# Altium PCB ARGUS.PcbDoc (part 2 of 4)
Units mm, origin at the board's own origin, x right, y up, seen from the top; angles counter-clockwise.
Board outline 134 x 81 mm, 6 copper layers (L1 [SIG], L2 [GND], L3 [PWR], L4 [SIG], L5 [GND], L6 [SIG]), stack 1.538 mm thick; 452 components, 305 nets, 1467 pads, 826 vias.
Unrouted connection lines stored in the file: 646.
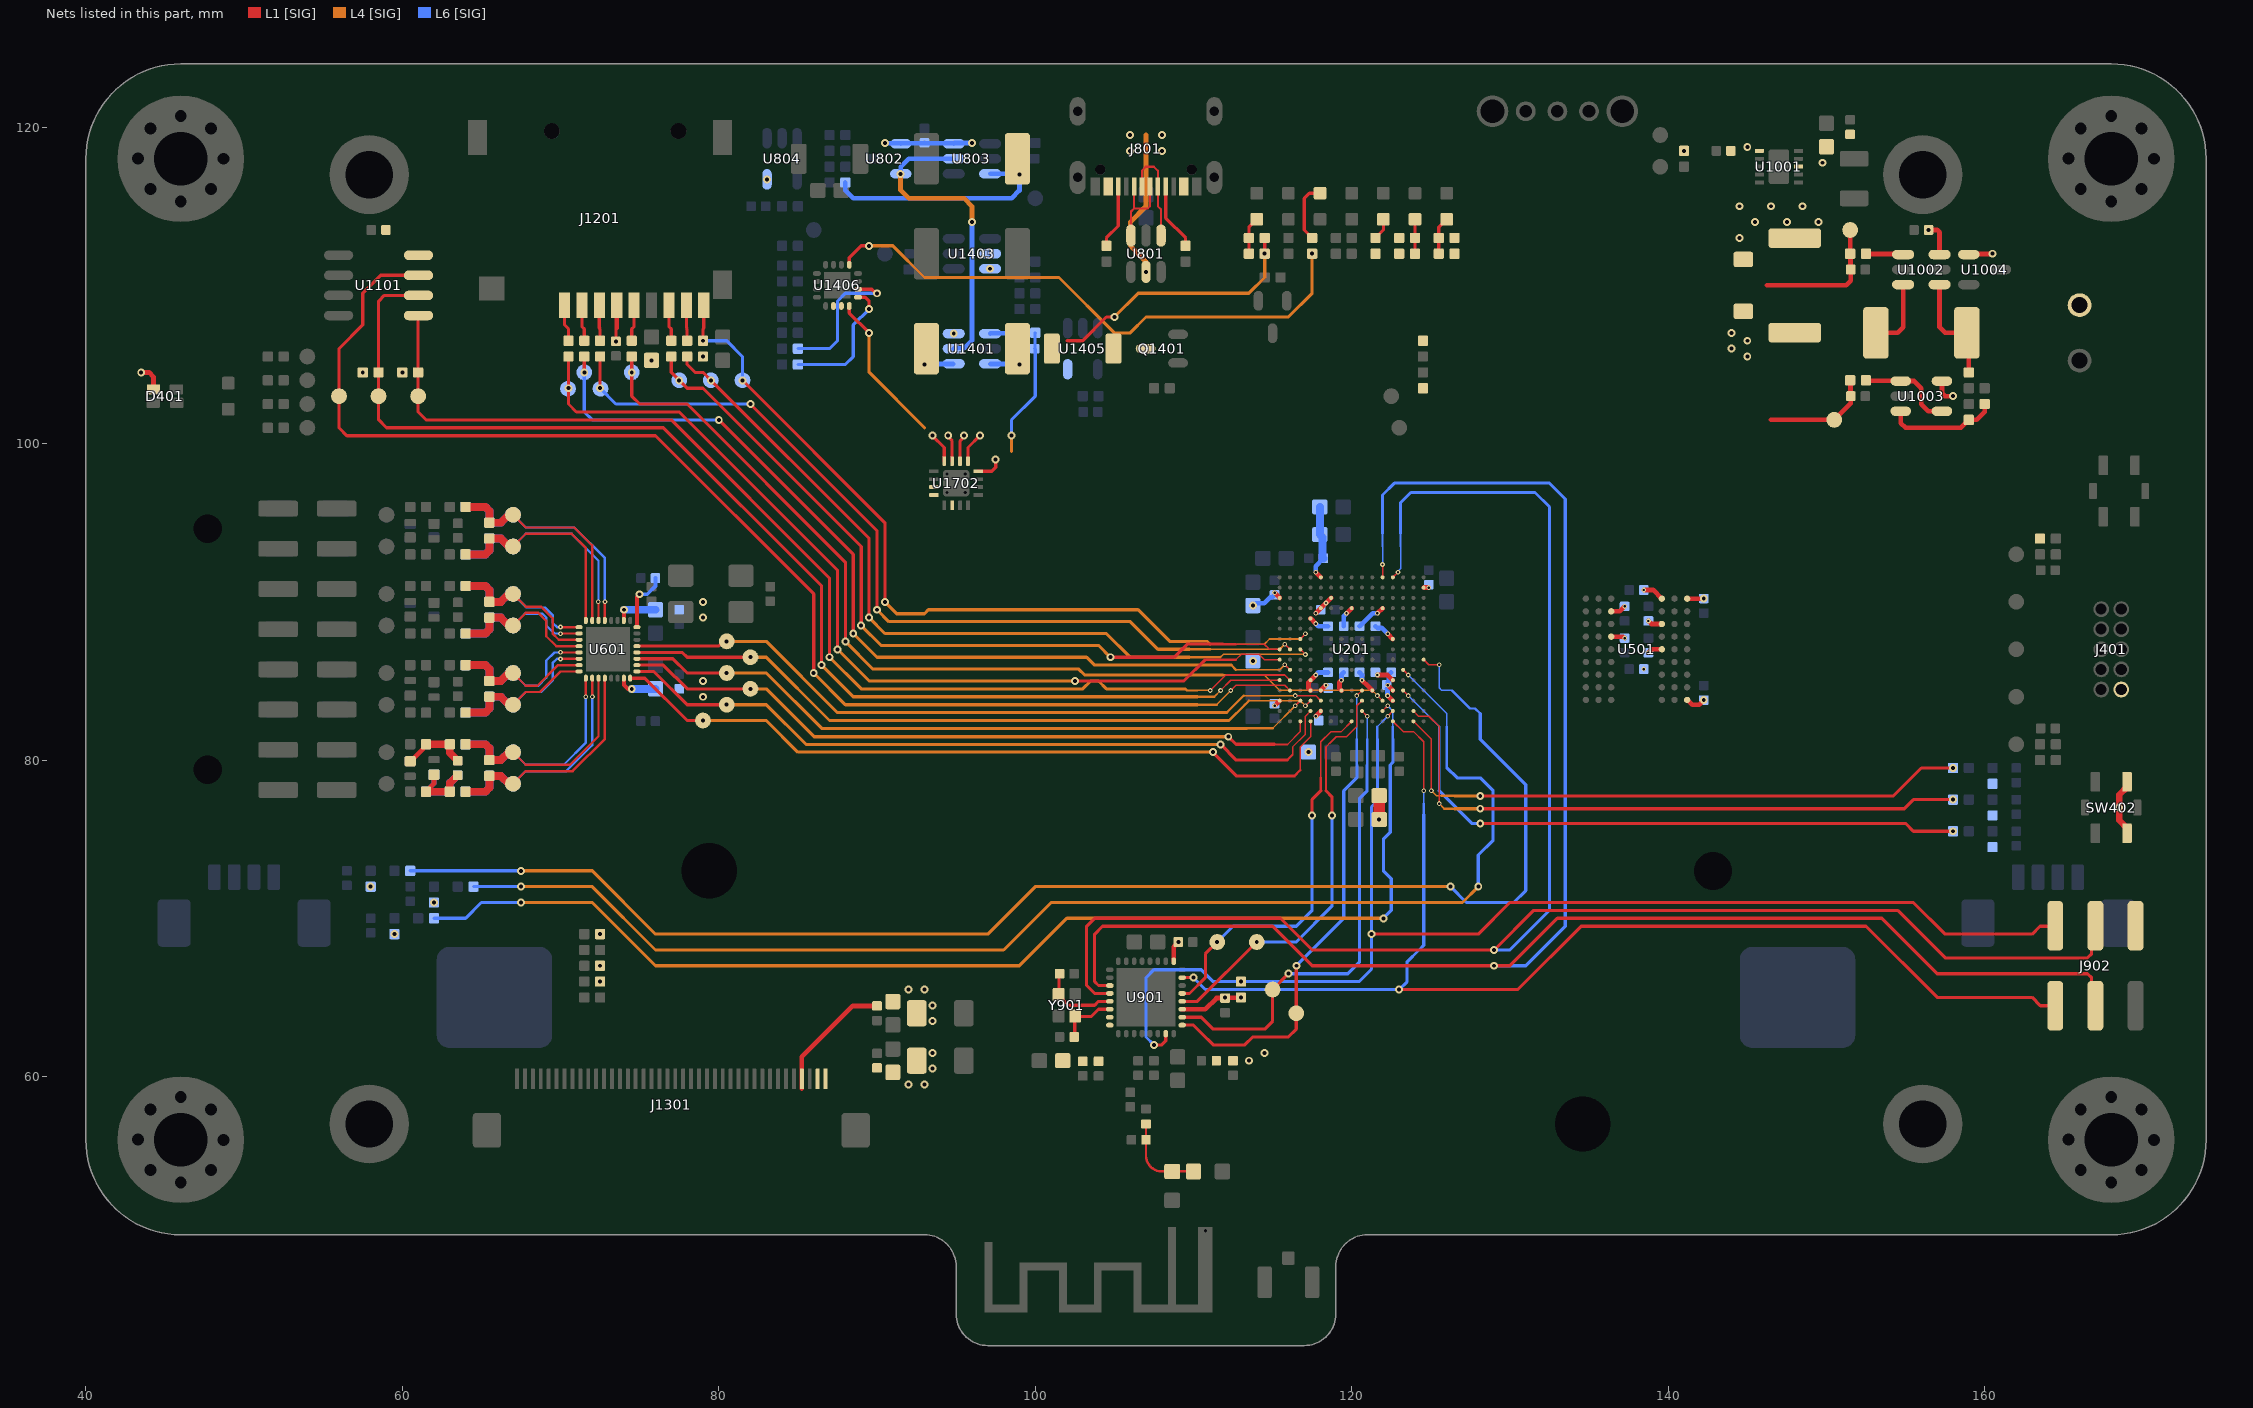
[diagram p6: the nets of this part, all layers, seen from the top]

## Footprints (in the part's own frame and the unit in brackets; to place one, negate y for a bottom-side part, rotate by r counter-clockwise, add the part's x,y. Pads: shape width x height; smd on the part's side, far side on the other; paste and mask are expansions set on the pad) (continued)
REF3016EAIDBZR [mm] "SOT23, 3-Leads, Body 2.92x2.37mm, Pitch 0.95mm, IPC Medium Density"
  oval 1.35x0.6 smd: 1(-1,0.95) 2(-1,-0.95) 3(1,0)
  silkscreen extent -1.61,-1.58 0.76,1.64, body extent -1.32,-1.46 1.32,1.46, height 1.12
RES_0402_A [mm] "Chip Resistor, 2-Leads, Body 1.00x0.50mm, IPC Low Density"
  rrect25% 0.65x0.65 smd: 1(-0.5,0) 2(0.5,0)
  body extent -0.5,-0.25 0.5,0.25, height 0.35
RES_0603_A [mm] "Chip Resistor, 2-Leads, Body 1.60x0.80mm, IPC Low Density"
  rrect25% 0.975x1 smd: 1(-0.913,0) 2(0.912,0)
  silkscreen extent -0.16,-0.51 0.16,0.51, body extent -0.8,-0.4 0.8,0.4, height 0.45
SC32S-7PF20PPM [mm] "32.768 kHz ±20ppm Crystal 7pF 70 kOhms 2-SMD, No Lead"
  rrect25% 1x1.8 smd: 1(-1.25,0) 2(1.25,0)
  silkscreen extent -0.6,-0.9 0.6,0.9, body extent -1.65,-0.8 1.65,0.8, height 0.84
SMLD12E3N1WT86 [mm] "Blue-Green 496nm LED Indication - Discrete 2.9V 0603 (1608 Metric)"
  rrect25% 0.8x0.8 smd: 1(-0.825,0) 2(0.825,0)
  silkscreen extent 0.5,-0.6 1.4,0.6, body extent -0.8,-0.4 0.8,0.4, height 0.55
STDCZS1-25M [mm] "25 MHz ±15ppm Crystal 8pF 80 Ohms 4-SMD, No Lead"
  rrect25% 0.85x0.75 smd: 1(-0.675,-0.525) 2(0.675,-0.525) 3(0.675,0.525) 4(-0.675,0.525)
  silkscreen extent -1.3,-1.1 -0.25,-0.25, body extent -1.05,-0.85 1.05,0.85, height 0.51
STM32H725IGK3 [mil]
  round 10 smd paste+0 mask+0: A1(-179.13,179.13) A2(-153.54,179.13) A3(-127.95,179.13) A4(-102.36,179.13) A5(-76.77,179.13) A6(-51.18,179.13) A7(-25.59,179.13) A8(0,179.13) A9(25.59,179.13) A10(51.18,179.13) A11(76.77,179.13) A12(102.36,179.13) A13(127.95,179.13) A14(153.54,179.13) A15(179.13,179.13) B1(-179.13,153.54) B2(-153.54,153.54) B3(-127.95,153.54) B4(-102.36,153.54) B5(-76.77,153.54) B6(-51.18,153.54) B7(-25.59,153.54) B8(0,153.54) B9(25.59,153.54) B10(51.18,153.54) B11(76.77,153.54) B12(102.36,153.54) B13(127.95,153.54) B14(153.54,153.54) B15(179.13,153.54) C1(-179.13,127.95) C2(-153.54,127.95) C3(-127.95,127.95) C4(-102.36,127.95) C5(-76.77,127.95) C6(-51.18,127.95) C7(-25.59,127.95) C8(0,127.95) C9(25.59,127.95) C10(51.18,127.95) C11(76.77,127.95) C12(102.36,127.95) C13(127.95,127.95) C14(153.54,127.95) C15(179.13,127.95) D1(-179.13,102.36) D2(-153.54,102.36) D3(-127.95,102.36) D4(-102.36,102.36) D5(-76.77,102.36) D6(-51.18,102.36) D7(-25.59,102.36) D8(0,102.36) D9(25.59,102.36) D10(51.18,102.36) D11(76.77,102.36) D12(102.36,102.36) D13(127.95,102.36) D14(153.54,102.36) D15(179.13,102.36) E1(-179.13,76.77) E2(-153.54,76.77) E3(-127.95,76.77) E4(-102.36,76.77) E12(102.36,76.77) E13(127.95,76.77) E14(153.54,76.77) E15(179.13,76.77) F1(-179.13,51.18) F2(-153.54,51.18) F3(-127.95,51.18) F4(-102.36,51.18) F6(-51.18,51.18) F7(-25.59,51.18) F8(0,51.18) F9(25.59,51.18) F10(51.18,51.18) F12(102.36,51.18) F13(127.95,51.18) F14(153.54,51.18) F15(179.13,51.18) G1(-179.13,25.59) G2(-153.54,25.59) G3(-127.95,25.59) G4(-102.36,25.59) G6(-51.18,25.59) G7(-25.59,25.59) G8(0,25.59) G9(25.59,25.59) G10(51.18,25.59) G12(102.36,25.59) G13(127.95,25.59) G14(153.54,25.59) G15(179.13,25.59) H1(-179.13,0) H2(-153.54,0) H3(-127.95,0) H4(-102.36,0) H6(-51.18,0) H7(-25.59,0) H8(0,0) H9(25.59,0) H10(51.18,0) H12(102.36,0) H13(127.95,0) H14(153.54,0) H15(179.13,0) J1(-179.13,-25.59) J2(-153.54,-25.59) J3(-127.95,-25.59) J4(-102.36,-25.59) J6(-51.18,-25.59) J7(-25.59,-25.59) J8(0,-25.59) J9(25.59,-25.59) J10(51.18,-25.59) J12(102.36,-25.59) J13(127.95,-25.59) J14(153.54,-25.59) J15(179.13,-25.59) K1(-179.13,-51.18) K2(-153.54,-51.18) K3(-127.95,-51.18) K4(-102.36,-51.18) K6(-51.18,-51.18) K7(-25.59,-51.18) K8(0,-51.18) K9(25.59,-51.18) K10(51.18,-51.18) K12(102.36,-51.18) K13(127.95,-51.18) K14(153.54,-51.18) K15(179.13,-51.18) L1(-179.13,-76.77) L2(-153.54,-76.77) L3(-127.95,-76.77) L4(-102.36,-76.77) L12(102.36,-76.77) L13(127.95,-76.77) L14(153.54,-76.77) L15(179.13,-76.77) M1(-179.13,-102.36) M2(-153.54,-102.36) M3(-127.95,-102.36) M4(-102.36,-102.36) M5(-76.77,-102.36) M6(-51.18,-102.36) M7(-25.59,-102.36) M8(0,-102.36) M9(25.59,-102.36) M10(51.18,-102.36) M11(76.77,-102.36) M12(102.36,-102.36) M13(127.95,-102.36) M14(153.54,-102.36) M15(179.13,-102.36) N1(-179.13,-127.95) N2(-153.54,-127.95) N3(-127.95,-127.95) N4(-102.36,-127.95) N5(-76.77,-127.95) N6(-51.18,-127.95) N7(-25.59,-127.95) N8(0,-127.95) N9(25.59,-127.95) N10(51.18,-127.95) N11(76.77,-127.95) N12(102.36,-127.95) N13(127.95,-127.95) N14(153.54,-127.95) N15(179.13,-127.95) P1(-179.13,-153.54) P2(-153.54,-153.54) P3(-127.95,-153.54) P4(-102.36,-153.54) P5(-76.77,-153.54) P6(-51.18,-153.54) P7(-25.59,-153.54) P8(0,-153.54) P9(25.59,-153.54) P10(51.18,-153.54) P11(76.77,-153.54) P12(102.36,-153.54) P13(127.95,-153.54) P14(153.54,-153.54) P15(179.13,-153.54) R1(-179.13,-179.13) R2(-153.54,-179.13) R3(-127.95,-179.13) R4(-102.36,-179.13) R5(-76.77,-179.13) R6(-51.18,-179.13) R7(-25.59,-179.13) R8(0,-179.13) R9(25.59,-179.13) R10(51.18,-179.13) R11(76.77,-179.13) R12(102.36,-179.13) R13(127.95,-179.13) R14(153.54,-179.13) R15(179.13,-179.13)
  silkscreen extent -205,-205 205,205, body extent -200,-200 200,200, height 24
TLA2528 [mm]
  rrect25% 0.6x0.24 smd: 1(-1.4,0.75) 2(-1.4,0.25) 3(-1.4,-0.25) 4(-1.4,-0.75) 9(1.4,-0.75) 10(1.4,-0.25) 11(1.4,0.25) 12(1.4,0.75)
  rrect25% 0.24x0.6 smd: 5(-0.75,-1.4) 6(-0.25,-1.4) 7(0.25,-1.4) 8(0.75,-1.4) 13(0.75,1.4) 14(0.25,1.4) 15(-0.25,1.4) 16(-0.75,1.4)
  round 0.3 hole 0.2: 17(-0.58,-0.58) 17(-0.58,0.58) 17(0.58,-0.58) 17(0.58,0.58)
  rrect25% 1.68x1.68 smd: 17(0,0)
  silkscreen extent -1.61,-1.6 1.6,1.6, body extent -1.5,-1.5 1.5,1.5, height 0.8
TPS61232DRCR [mm] "Boost Switching Regulator IC Positive Fixed 5V 1 Output 5A (Switch) 10-VFDFN Exposed Pad"
  rrect25% 0.6x0.24 smd: 1(-1.4,1) 2(-1.4,0.5) 3(-1.4,0) 4(-1.4,-0.5) 5(-1.4,-1) 6(1.4,-1) 7(1.4,-0.5) 8(1.4,0) 9(1.4,0.5) 10(1.4,1)
  rrect25% 0.18x0.625 smd: 11(-0.615,1.188) 11(-0.615,1.388) 11(-0.615,-1.388) 11(-0.615,-1.188) 11(-0.205,1.188) 11(-0.205,1.388) 11(-0.205,-1.388) 11(-0.205,-1.188) 11(0.205,1.188) 11(0.205,1.388) 11(0.205,-1.388) 11(0.205,-1.188) 11(0.615,1.188) 11(0.615,1.388) 11(0.615,-1.388) 11(0.615,-1.188)
  round 0.4 hole 0.2: 11(-0.55,0) 11(0,0.825) 11(0,-0.825) 11(0.55,0)
  rrect25% 1.6x2.15 smd: 11(0,0)
  silkscreen extent -1.61,-1.6 1.6,1.6, body extent -1.5,-1.5 1.5,1.5, height 0.77
TPS79933DDCR [mm] "SOT23, 5-Leads, Body 2.90x2.80mm, Pitch 0.95mm, IPC Medium Density"
  oval 1.35x0.6 smd: 1(-1.2,0.95) 2(-1.2,0) 3(-1.2,-0.95) 4(1.2,-0.95) 5(1.2,0.95)
  silkscreen extent -1.81,-1.59 0.94,1.76, body extent -1.53,-1.45 1.53,1.45, height 1.1
TS21-34-035-BK-160-SMT-TR [mm] "Tactile Switch SPST-NO Top Actuated Surface Mount"
  rrect25% 1.25x0.6 smd: 1(-1.625,1) 1(1.625,1) 2(-1.625,-1) 2(1.625,-1)
  rrect25% 1x0.5 smd: 3(0,1.65) 3(0,-1.65)
  silkscreen extent -1.8,-1.8 1.8,1.8, body extent -2,-1.7 2,1.7, height 1.5
U.FL-R-SMT-1(80) [mm] "U.FL (UMCC) Connector Receptacle, Male Pin 50 Ohms Surface Mount Solder"
  rrect25% 0.8x0.85 smd: 1(0,-1.525)
  rrect25% 0.9x2 smd: 2(-1.5,0) 3(1.5,0)
  silkscreen extent -1.4,-1.4 1.4,1.4, body extent -1.5,-1.55 1.5,1.55, height 1.25
"Unlabelled Testpoint" [mm] "1.5mm Diameter testpoint"
  round 1 smd paste-2539.97: 1(0,0)
  silkscreen extent -0.6,-0.6 0.6,0.6
USB4105-GF-A [mm] "USB-C (USB TYPE-C) USB 2.0 Receptacle Connector 24 (16+8 Dummy) Position Surface Mount, Right Angle; Through Hole"
  rect 0.6x1.15 smd mask+0.05: A1B12(-3.2,4.755) A4B9(-2.4,4.755) A9B4(2.4,4.755) A12B1(3.2,4.755)
  rect 0.3x1.15 smd mask+0.05: A5(-1.25,4.755) A6(-0.25,4.755) A7(0.25,4.755) A8(1.25,4.755) B5(1.75,4.755) B6(0.75,4.755) B7(-0.75,4.755) B8(-1.75,4.755)
  oval 1x2.1 hole 0.6 slot 1.7 at 90 deg paste+0: SH(-4.32,4.18) SH(4.32,4.18)
  oval 1x1.8 hole 0.6 slot 1.4 at 90 deg paste+0: SH(-4.32,0) SH(4.32,0)
  round 0.65 hole 0.65 unplated: ""(-2.89,3.68) ""(2.89,3.68)
  silkscreen extent -4.47,-2.6 4.47,2.65, body extent -4.47,-2.6 4.47,5.11, height 3.31
USBLC6-2SC6 [mm] "SOT23, 6-Leads, Body 2.93x2.80mm, Pitch 0.95mm, IPC Medium Density"
  oval 1.4x0.6 smd: 1(-1.15,0.95) 2(-1.15,0) 3(-1.15,-0.95) 4(1.15,-0.95) 5(1.15,0) 6(1.15,0.95)
  silkscreen extent -1.79,-1.59 0.94,1.76, body extent -1.5,-1.46 1.5,1.46, height 1.45
VMS-R010-1.0-U [mm] "Chip Resistor, 2-Leads, Body 6.35x3.05mm, IPC Medium Density"
  rrect25% 1.6x3.25 smd: 1(-2.875,0) 2(2.875,0)
  silkscreen extent -1.81,-1.69 1.81,1.69, body extent -3.18,-1.53 3.18,1.53, height 0.55
Waveshare_16249 [mm]
  round 5 hole 3: M(-49.09,30) M(-49.09,-30) M(49.09,30) M(49.09,-30)
  body extent -53,-33.95 53,33.95, height 20.45

## Part data
ANT901: library part Meandering_Inverted_F_Antenna, "2.4GHz meandering inverted F antenna. Taken from Texas Instruments AN043."
C301 C303 C314 C316 C318 C319 C321 C325 C326 C327 C601 C603 C801 C901 C907 C910 C1001 C1201 C1203 C1302 C1305 C1405 C1406 C1407 C1408 C1603 C1604 C1607 C1701 C1703 C1705 C1710: library part CAP_0603, "0603 SMD Capacitor"
C302 C304 C305 C306 C307 C308 C309 C310 C311 C312 C313 C315 C317 C320 C322 C323 C324 C401 C402 C403 C404 C501 C502 C503 C504 C505 C506 C507 C508 C602 C604 C605 C606 C607 C608 C701_1 C701_2 C701_3 C701_4 C701_5 C701_6 C701_7 C701_8 C802 C803 C804 C902 C903 C904 C905 C906 C908 C909 C911 C912 C913 C914 C1002 C1003 C1005 C1006 C1007 C1101 C1202 C1301 C1304 C1401 C1402 C1403 C1404 C1502 C1504 C1606 C1608 C1610 C1612 C1702 C1704 C1706 C1707 C1708 C1709 C1801 C1802 C1803 C1804 C1805 C1806: library part CAP_0402, "0402 SMD Capacitor"
C1004: library part CAP_GENERIC_POLARISED, "10 F (EDLC) Supercapacitor 3.8 V Radial, Can 510mOhm @ 1kHz 1000 Hrs @ 85°C", Part Number=LIC0813Q3R8106
C1303 C1306 C1501 C1503 C1601 C1602 C1605 C1609 C1611: library part CAP_1206, "1206 SMD Capacitor"
D401: "Red, Green, Blue (RGB) 624nm Red, 525nm Green, 470nm Blue LED Indication - Discrete 2.1V Red, 3.35V Green, 3.35V Blue 0606 (1616 Metric)", Supplier 1="Arrow Electronics", Supplier Part Number 1=LTST-C19HE1WT
D402 D1401 D1402 D1404 D1405 D1501 D1601 D1602: library part LED_Generic, Part Number=SMLD12E3N1WT86, Supplier Part Number 1=SMLD12E3N1WT86CT-ND, Supplier 1=DigiKey
D701_1 D701_2 D701_3 D701_4 D701_5 D701_6 D701_7 D701_8 D702_1 D702_2 D702_3 D702_4 D702_5 D702_6 D702_7 D702_8: "TVS DIODE 21VWM 35.7VC CST2C", Supplier 1=Avnet, Supplier Part Number 1=DF2S23P2CTC,L3F
D1001: "DIODE SCHOTTKY 100V 500MA SOD123", Supplier Part Number 1=3757-BAS100AS_R1_00001CT-ND, Supplier 1=DigiKey
DISP1301: library part Waveshare_16249, "Connector for Waveshare 16249 Display."
F1401 F1402 F1501 F1601: library part FUSE_GENERIC, "Generic Fuse Symbol", Part Number=0ZCJ0100FF2E, Supplier Part Number 1=48AC8418, Supplier 1=Avnet
F1602: library part FUSE_GENERIC, "Generic Fuse Symbol", Part Number=0ZCH0010FF2E, Supplier Part Number 1=48AC8402, Supplier 1=Avnet
J401: "Connector Header Through Hole 10 position 0.050\" (1.27mm)", Supplier Part Number 1=1175-1627-ND, Supplier 1=DigiKey
J601: "Connector Header Surface Mount, Right Angle 16 position 0.100\" (2.54mm)", Supplier Part Number 1=732-6072-6-ND, Supplier 1=DigiKey
J602: "16 Position Receptacle Connector 0.100\" (2.54mm) Surface Mount, Right Angle Gold", Supplier Part Number 1=952-3179-1-ND, Supplier 1=DigiKey
J801: "USB-C (USB TYPE-C) USB 2.0 Receptacle Connector 24 (16+8 Dummy) Position Surface Mount, Right Angle; Through Hole", Supplier 1="Future Electronics", Supplier Part Number 1=USB4105-GF-A
J901: "U.FL (UMCC) Connector Receptacle, Male Pin 50 Ohms Surface Mount Solder", Supplier 1="Future Electronics", Supplier Part Number 1=U.FL-R-SMT-1(10)
J902: "Connector Header Surface Mount 6 position 0.100\" (2.54mm)", Supplier Part Number 1=952-1922-ND, Supplier 1=DigiKey
J1201: "CONN MICROSD CARD R/A SMD", Supplier 1="Arrow Electronics", Supplier Part Number 1=MSD-1-A
J1301: "40 Position FFC, FPC Connector Contacts, Bottom 0.020\" (0.50mm) Surface Mount, Right Angle", Supplier 1="Future Electronics", Supplier Part Number 1=FH12-40S-0.5SH(55)
J1401: library part 1042P, "BATTERY HOLDER 18650 SMD", Supplier Part Number 1=36-1042P-ND, Supplier 1=DigiKey
J1801 J1802: "Connector Header Surface Mount, Right Angle 4 position 0.049\" (1.25mm)", Supplier 1="Arrow Electronics", Supplier Part Number 1=0532614004
L901 L902: library part IND_GENERIC, "LQG15HN2N0C02D", Part Number=LQG15HN2N0C02D
L1501: library part IND_GENERIC, "1 µH Shielded Molded Inductor 7.5 A 18.1mOhm Max Nonstandard", Supplier Part Number 1=IHLP2020BZER1R0M11, Supplier 1="Arrow Electronics"
L1601: library part IND_GENERIC, "Generic inductor symbol", Part Number=74438324015
MH101 MH102 MH103 MH104: library part M3_Mounting_Hole
Q1401 Q1402: "MOSFET P-CH 20V 4.3A SOT23", Supplier Part Number 1=DMP2045U-7DICT-ND, Supplier 1=DigiKey
R401 R402 R403 R404 R405 R406 R407 R408 R701_1 R701_2 R701_3 R701_4 R701_5 R701_6 R701_7 R701_8 R702_1 R702_2 R702_3 R702_4 R702_5 R702_6 R702_7 R702_8 R703_1 R703_2 R703_3 R703_4 R703_5 R703_6 R703_7 R703_8 R704_1 R704_2 R704_3 R704_4 R704_5 R704_6 R704_7 R704_8 R705_1 R705_2 R705_3 R705_4 R705_5 R705_6 R705_7 R705_8 R801 R802 R804 R805 R806 R807 R808 R809 R901 R1001 R1002 R1003 R1006 R1007 R1008 R1009 R1010 R1101 R1102 R1201 R1202 R1203 R1204 R1205 R1206 R1207 R1301 R1302 R1303 R1304 R1305 R1401 R1402 R1403 R1404 R1405 R1406 R1407 R1408 R1409 R1410 R1411 R1412 R1413 R1415 R1416 R1417 R1419 R1420 R1421 R1422 R1424 R1425 R1426 R1427 R1428 R1429 R1430 R1431 R1501 R1502 R1503 R1504 R1505 R1506 R1601 R1602 R1603 R1604 R1605 R1606 R1607 R1608 R1609 R1610 R1611 R1612 R1701 R1702 R1801 R1802 R1803 R1804 R1805 R1806 R1807 R1808 R1809 R1810 R1811 R1812: library part RES_0402, "0402 SMD Resistor"
R803 R1005 R1414 R1418: library part RES_GENERIC, "VMS-R010-1.0-U", Power=4W, Supplier Part Number 1=4423-VMS-R010-1.0-UDKR-ND, Supplier 1=DigiKey
R902 R903: library part RES_0603, "0603 SMD Resistor"
R1004: library part RES_GENERIC, "Generic resistor symbol", Part Number=CRM2512-FX-10R0ELF
SW401 SW402: "Tactile Switch SPST-NO Top Actuated Surface Mount", Supplier Part Number 1=2223-TS21-34-035-BK-160-SMT-TRDKR-ND, Supplier 1=DigiKey
SW1401: "SWITCH SLIDE SPDT 100MA 12V"
TP301 TP302 TP401 TP402 TP403 TP405 TP406 TP407 TP408 TP601 TP602 TP603 TP604 TP605 TP607 TP608 TP609 TP610 TP611 TP612 TP613 TP614 TP615 TP616 TP617 TP618 TP619 TP620 TP621 TP622 TP623 TP624 TP625 TP626 TP627 TP628 TP629 TP630 TP631 TP632 TP633 TP634 TP635 TP636 TP637 TP638 TP639 TP802 TP803 TP901 TP902 TP903 TP904 TP1001 TP1002 TP1003 TP1004 TP1005 TP1006 TP1101 TP1102 TP1103 TP1201 TP1202 TP1203 TP1204 TP1205 TP1206 TP1207 TP1401 TP1402 TP1403 TP1404 TP1405 TP1408 TP1409 TP1410 TP1501 TP1502 TP1504 TP1601 TP1603 TP1605: library part "Unlabelled Testpoint", "Symbol for an unlabelled testpoint"
TP801 TP1406 TP1407 TP1503 TP1602 TP1604: library part "Labelled Testpoint", "Symbol for a labelled testpoint"
U201: "High-performance and DSP with DP-FPU, Arm Cortex-M7 MCU with 1 MByte Flash, 564 KBytes RAM, 550 MHz CPU, L1 cache, external memory interface, SMPS, subset of peripherals", Manufacturer_Name=STMicroelectronics, Manufacturer_Part_Number=STM32H725IGK3, RefDes=RefDes, Supplier 1="Future Electronics", Supplier Part Number 1=STM32H725IGK3, Type=Type
U501: "SDRAM Memory IC 128Mbit Parallel 166 MHz 5 ns 54-TFBGA (8x8)", Supplier Part Number 1=1450-AS4C8M16SA-6BINCT-ND, Supplier 1=DigiKey
U601: "24 Bit Analog to Digital Converter 8 Input 8 Sigma-Delta 32-QFN (4x4)", Supplier Part Number 1=296-ADS131M08IRSNTCT-ND, Supplier 1=DigiKey
U801: "17V Clamp 5A (8/20µs) Ipp Tvs Diode Surface Mount SOT-23-6", Supplier 1="Arrow Electronics", Supplier Part Number 1=USBLC6-2SC6
U802 U1004: "Series Voltage Reference IC Fixed 1.65V V ±0.1% 25 mA SOT-23-3", Supplier Part Number 1=296-REF3016EAIDBZRCT-ND, Supplier 1=DigiKey
U803 U1002 U1401 U1403: "Current Sense Amplifier 1 Circuit Rail-to-Rail SOT-23-6", Supplier Part Number 1=296-INA181A2QDBVRQ1CT-ND, Supplier 1=DigiKey
U804 U1003 U1404 U1405 U1502 U1602 U1604: "Standard (General Purpose) Amplifier 1 Circuit Rail-to-Rail SOT-23-5", Supplier 1="Arrow Electronics", Supplier Part Number 1=MCP6071T-E/OT
U901: "ESP32-C3FH4X IS AN LOW-POWER AND", Supplier Part Number 1=1965-ESP32-C3FH4XCT-ND, Supplier 1=DigiKey
U1001: "IC RTC CLK/CALENDAR I2C 10DFN", Supplier Part Number 1=PCF85363ATL/AX, Supplier 1="Arrow Electronics"
U1101: "IC EEPROM 2KBIT I2C 400KHZ 8SOIC", Supplier 1="Arrow Electronics", Supplier Part Number 1=M24C02-WMN6TP
U1406: "Charger IC Lithium Ion 16-VQFN (3x3)", Supplier Part Number 1=296-38873-1-ND, Supplier 1=DigiKey
U1501: "Boost Switching Regulator IC Positive Fixed 5V 1 Output 5A (Switch) 10-VFDFN Exposed Pad", Supplier Part Number 1=296-44498-6-ND, Supplier 1=DigiKey
U1601: "Buck Switching Regulator IC Positive Adjustable 1V 1 Output 1.5A 12-WFDFN Exposed Pad", Supplier Part Number 1=296-LM63615DQDRRRQ1DKR-ND, Supplier 1=DigiKey
U1603: "Linear Voltage Regulator IC Positive Fixed 1 Output 200mA SOT-23-THIN", Supplier Part Number 1=296-17783-6-ND, Supplier 1=DigiKey
U1701 U1702: "12 Bit Analog to Digital Converter 8 Input 1 SAR 16-WQFN (3x3)", Supplier Part Number 1=595-TLA2528IRTER, Supplier 1=Mouser
Y401: "25 MHz ±15ppm Crystal 8pF 80 Ohms 4-SMD, No Lead", Supplier Part Number 1=644-STDCZS1-25MDKR-ND, Supplier 1=DigiKey
Y601: "8.192 MHz ±30ppm Crystal 10pF 150 Ohms 4-SMD, No Lead", Supplier Part Number 1=1923-LFXTAL061486CT-ND, Supplier 1=DigiKey
Y901: "40 MHz ±10ppm Crystal 10pF 40 Ohms 4-SMD, No Lead", Supplier 1="Future Electronics", Supplier Part Number 1=ECS-400-10-37B2-CKY-TR
Y1001: "32.768 kHz ±20ppm Crystal 7pF 70 kOhms 2-SMD, No Lead", Supplier 1="Arrow Electronics", Supplier Part Number 1=SC32S-7PF20PPM

## Via types
v1: diameter 0.5, hole 0.25, L1 [SIG] to L6 [SIG], tented both sides, 608 vias
v2: diameter 0.3, hole 0.15, L1 [SIG] to L6 [SIG], tented both sides, 209 vias
v3: diameter 0.5, hole 0.2, L1 [SIG] to L6 [SIG], tented both sides, 9 vias

## Nets (pads, with @x,y where several pads share a name; then routed paths per layer and width w, separated by ;. In a path a pad name is that pad's centre, name@x,y a point inside that pad or via, vN(x,y) a via of type N, cw(c..) or ccw(c..) an arc to the next point about the centre after c; other vN are vias at no path point)
5V_SW: L1501.1 TP1501.1 U1501.1 U1501.2
+1V65_REF: TP1401.1 U802.2 U803.5 U1401.5 U1403.5 | length 19.9
  L4 [SIG] w0.3: v1(91.487,117.038) 91.487,116.013 92,115.5 95.5,115.5 96,115 v1(96,114)
  L6 [SIG] w0.3: U802.2@91.5,117.05 91.5,117.5 92,118 U803.5@94.85,118 ; U1401.5@94.85,106 94.907,106.057 95.557,106.057 96,106.5 96,112.5 v1(96,114) ; U1403.5@97.093,112.057 U1403.5@97.15,112
+3V3: C301.1 C302.1 C303.1 C304.1 C305.1 C306.1 C307.1 C308.1 C309.1 C310.1 C311.1 C312.1 C313.1 C318.1 C319.1 C320.1 C321.1 C322.1 C323.1 C324.1 C501.1 C502.1 C503.1 C504.1 C505.1 C506.1 C507.1 C508.1 C601.1 C602.1 C901.1 C902.1 C903.1 C904.1 C905.1 C906.1 C1101.1 C1201.1 C1202.1 C1304.1 C1305.1 C1306.1 C1703.1 C1704.1 C1708.1 C1709.1 D401.4 D1001.1 F1601.2 J401.1 J902.1 J1201.4 J1301.4 L902.2 R401.2 R901.1 R1001.1 R1002.1 R1003.1 R1101.1 R1102.1 R1207.1 R1301.1 R1304.1 R1305.1 R1801.1 R1803.1 R1805.1 R1807.1 R1809.1 R1811.1 SW402.2 TP1602.1 U201.A3 U201.A13 U201.D4 U201.D5 U201.D11 U201.E2 U201.E4 U201.E12 U201.E15 U201.F13 U201.G4 U201.H12 U201.K4 U201.L12 U201.M5 U201.M9 U201.R14 U501.A7 U501.A9 U501.B3 U501.C7 U501.D3 U501.E7 U501.J9 U601.26 U901.11 U901.17 U901.31 U901.32 U1101.8 U1701.10 U1702.10 | length 53.4
  L1 [SIG] w0.2: v1(73.5,106.46) 73.5,107.25 73.55,107.3
  L1 [SIG] w0.25: U601.26@74,88.825 v1(74,89.5)
  L1 [SIG] w0.3: v1(43.5,104.5) 44,104.5 44.275,104.225 D401.4@44.275,103.425 ; J1201.4@73.5,108.7 J1201.4@73.55,108.75 73.55,107.3 ; J1301.4@85.25,59.25 J1301.4@85.25,59.85 85.25,61.25 88.46,64.46 C1304.1@90,64.46 ; U901.17@108.75,67.287 108.75,68.2 109.04,68.49 v1(109.04,68.5) ; U901.11@109.287,64.25 110.75,64.25 111.46,64.96 C905.1@112,64.96 ; v1(112,65) 112.02,64.98 112.98,64.98 v1(113,65) ; v2(115.125,83.425) U201.A3@115.45,83.75 ; v2(115.125,90.575) U201.A13@115.45,90.25 ; U201.D4@117.4,84.4 117.4,84.414 117.275,84.539 117.275,84.925 U201.D5@117.4,85.05 v2(117.725,85.375) ; U201.D11@117.4,88.95 v2(117.725,88.625) ; v2(117.725,82.775) U201.E2@118.05,83.1 ; v2(117.725,89.275) U201.E12@118.05,89.6 v2(118.375,89.925) U201.F13@118.7,90.25 ; v2(117.725,91.875) U201.E15@118.05,91.55 ; U201.E4@118.05,84.4 v2(118.375,84.725) ; U201.G4@119.35,84.4 119.225,84.525 119.225,84.925 v2(119.35,85.05) ; v2(119.675,89.275) U201.H12@120,89.6 ; v2(120.65,85.05) 121.031,84.669 U201.K4@121.3,84.4 ; v2(121.625,85.375) 122.275,85.375 U201.M5@122.6,85.05 ; v2(121.625,89.275) U201.L12@121.95,89.6 ; v2(122.275,87.975) U201.M9@122.6,87.65 ; U201.R14@124.55,90.9 v2(124.875,90.9) ; U501.D3@136.4,87.8 137.16,87.8 v2(137.25,87.71) ; U501.B3@136.4,89.4 136.94,89.4 v2(137.25,89.71) ; v2(138.46,90.75) 139.05,90.75 U501.A7@139.6,90.2 ; v2(138.75,86.79) 138.96,87 U501.E7@139.6,87 ; v2(138.75,88.79) 138.94,88.6 U501.C7@139.6,88.6 ; U501.J9@141.2,83.8 141.221,83.8 141.521,83.5 141.96,83.5 v1(142.25,83.79) ; U501.A9@141.2,90.2 142.24,90.2 v1(142.25,90.21)
  L1 [SIG] w0.4: SW402.2@169,75.375 169,75.7 168.5,76.2 168.5,77.8 169,78.3 SW402.2@169,78.625
  L6 [SIG] w0.3: v1(113.75,89.763) 113.901,89.914 114.464,89.914 114.84,90.29 114.965,90.29 115.125,90.45 v2(115.125,90.575) ; v2(117.725,85.375) 117.89,85.54 C304.1@118.5,85.54 ; v2(117.725,88.625) 117.89,88.46 C305.1@118.5,88.46 ; v2(117.725,91.875) 117.725,92.255 118.21,92.74 C320.1@118.21,92.75 ; v2(119.35,85.05) 119.35,85.39 C308.1@119.5,85.54 ; C309.1@119.5,88.46 119.5,89.1 v2(119.675,89.275) ; C310.1@120.5,85.54 120.65,85.39 v2(120.65,85.05) ; C311.1@120.5,88.46 120.51,88.46 121.325,89.275 v2(121.625,89.275) ; C313.1@121.5,88.46 121.613,88.347 121.902,88.347 v2(122.275,87.975)
  L6 [SIG] w0.5: v1(74,89.5) C601.1@76,89.5 ; C318.1@117.987,96 C319.1@117.987,94.25 118.16,94.078 118.16,92.8 C320.1@118.21,92.75
  other v1: 113.5,61 114.5,61.5 93.5,63.5 93.5,64.5 92,65.5 93,65.5 72.5,66 72.5,67 59.5,69 72.5,69 62,71 58,72 168.5,77 117.263,80.5 113.75,86.263 79,89 79,90 57.5,104.5 60,104.5 75.75,105.262 79,105.5 145,105.5 144,106 145,106.5 144,107 141,118.5
  other v2: 138.46,85.75
+3V3_BOOT: C1604.1 U1601.2
+3V3_FUSE: C1605.1 C1606.1 F1601.1 L1601.1 R1603.1 R1604.1 R1605.1 U1601.8
+3V3_LED_A: D1601.1 R1603.2 R1604.2 | length 2.2
  L1 [SIG] w0.2: R1603.2@124,112 R1604.2@124,113 D1601.1@124,114.175
+3V3_R\E\S\E\T\: R1602.1 U1601.7
+3V3_RTC: C1001.1 C1002.1 C1003.1 D1001.2 R1004.1 U1001.3 U1001.10
  other v1: 144.5,113 145.5,114 147.5,114 149.5,114 144.5,115 146.5,115 148.5,115 149.75,117.75 145,118.75
+3V3_SW: C1604.2 L1601.2 U1601.1
+3V3_V_DIV: R1606.2 R1607.1 U1602.3
+3V3_V_SENS: C1608.1 TP1603.1 U1602.1 U1602.4 U1702.1 | length 1.9
  L1 [SIG] w0.2: U1702.1@95.75,98.9 95.75,99.75 v1(96.5,100.5)
+3V3_VCC: C1607.1 R1602.2 TP1601.1 U1601.3
+3V3A: C314.1 C315.1 C316.1 C317.1 C603.1 C604.1 C802.1 C1005.1 C1701.1 C1702.1 C1706.1 C1707.1 F1602.2 R1608.1 R1609.1 R1610.1 TP1604.1 U201.M3 U201.M4 U601.15 U802.1 U803.6 U804.5 U1002.6 U1003.5 U1004.1 U1401.6 U1403.6 U1404.5 U1405.5 U1502.5 U1602.5 U1604.5 U1701.7 U1702.7 | length 17.1
  L1 [SIG] w0.25: U601.15@74,85.175 74,84.75 74.25,84.5 v1(74.5,84.5)
  L1 [SIG] w0.3: v2(122.267,84.075) U201.M3@122.592,83.75 ; v2(122.275,84.725) U201.M4@122.6,84.4 ; U201.M3@122.584,83.75 U201.M3@122.6,83.75 ; v1(156.46,113.5) 157,113.5 157.15,113.35 U1002.6@157.15,111.95 ; U1003.5@157.3,103.95 157.3,103.2 157.5,103 v1(158,103) ; U1004.1@159,111.95 159.025,111.975 160.475,111.975 v1(160.5,112)
  L1 [SIG] w0.75: v1(121.737,76.25) C314.1@121.737,77.75
  L6 [SIG] w0.3: v1(90.5,119) 90.525,118.975 91.475,118.975 U802.1@91.5,118.95 91.525,118.975 92.975,118.975 C802.1@93,119 93.025,118.975 94.825,118.975 U803.6@94.85,118.95 94.9,119 v1(96,119) ; C315.1@122.21,84.5 122.267,84.443 v2(122.267,84.075) ; v2(122.275,84.725) 122.275,84.936 122.34,85.001 122.34,85.39 122.49,85.54 C317.1@122.5,85.54
  L6 [SIG] w0.5: v1(74.5,84.5) C603.1@76,84.5
  other v1: 79,84 79,85 94.85,106.95 97.15,111.05 83.05,116.7
+3V3A_FUSE: C1611.1 F1602.1 U1603.5
+3V3A_LED_A: D1602.1 R1608.2 R1609.2 | length 2.4
  L1 [SIG] w0.2: R1609.2@125.5,112 R1608.2@125.5,113 125.5,113.675 D1602.1@126,114.175
+3V3A_NR: C1610.1 U1603.4
+3V3A_V_DIV: R1611.2 R1612.1 U1604.3
+3V3A_V_SENS: C1612.1 TP1605.1 U1604.1 U1604.4 U1702.2 | length 1.7
  L1 [SIG] w0.2: U1702.2@95.25,98.9 95.25,100.169 95.5,100.419 v1(95.5,100.5)
+5V: C1301.1 C1302.1 C1303.1 F1501.2 J1301.1 J1301.2 R1501.2 R1506.1 TP1503.1
  other v1: 92,59.5 93,59.5 93.5,60.5 93.5,61.5
+5V_DIV: R1502.1 R1503.1 U1502.3
+5V_LED_A: D1501.1 R1506.2 | length 1.4
  L1 [SIG] w0.2: R1506.2@121.5,113 122,113.5 D1501.1@122,114.175
+5V_OUT: C1503.1 F1501.1 U1501.3 U1501.4 U1501.7
+5V_SENS: C1504.1 R1505.2 TP1504.1 U1702.16 | length 1.7
  L1 [SIG] w0.2: U1702.16@96.4,98.25 97.25,98.25 97.5,98.5 v1(97.5,99)
+5V_SENS_OUT: R1505.1 U1502.1 U1502.4
\P\G\O\O\D\_LED_K: D1404.2 R1424.1 | length 3.8
  L1 [SIG] w0.2: R1424.1@117.5,113 117,113.5 117,115.5 117.325,115.825 D1404.2@118,115.825
ADC_C\S\: TP634.1 U201.D2 U601.17 | length 47.1
  L1 [SIG] w0.1: 116.262,80.338 116.262,80.825 117.075,81.638 117.075,82.775 U201.D2@117.4,83.1
  L1 [SIG] w0.15: 115.925,80 116.262,80.338
  L1 [SIG] w0.2: U601.17@74.825,85.6 75.9,85.6 78,83.5 v1(80.5,83.5) ; v1(111.712,80.988) 112.7,80 115.925,80
  L4 [SIG] w0.2: v1(80.5,83.5) 83,83.5 85.512,80.988 v1(111.712,80.988)
ADC_D\R\D\Y\: TP638.1 U201.C1 U601.18 | length 45
  L1 [SIG] w0.1: 115.937,80.988 116.75,81.8 U201.C1@116.75,82.45
  L1 [SIG] w0.15: 115.125,80.988 115.937,80.988
  L1 [SIG] w0.2: U601.18@74.825,86 76.5,86 78,84.5 v1(82,84.5) ; v1(112.2,81.475) 112.687,80.988 112.7,81 115.113,81
  L4 [SIG] w0.2: v1(82,84.5) 83,84.5 86.025,81.475 v1(112.2,81.475)
ADC_DIN: TP635.1 U201.E3 U601.21 | length 45.8
  L1 [SIG] w0.1: v2(116.425,84.075) 117.725,84.075 U201.E3@118.05,83.75
  L1 [SIG] w0.2: U601.21@74.825,87.2 79.984,87.2 80.284,87.5 v1(80.5,87.5)
  L4 [SIG] w0.1: 113.175,84.075 113.5,84.075 v2(116.425,84.075)
  L4 [SIG] w0.15: 112.1,83 113.175,84.075
  L4 [SIG] w0.2: v1(80.5,87.5) 83,87.5 87.5,83 112.1,83
ADC_DOUT: TP636.1 U201.D3 U601.20 | length 45.1
  L1 [SIG] w0.1: v2(117.075,83.425) U201.D3@117.4,83.75
  L1 [SIG] w0.2: U601.20@74.825,86.8 77.7,86.8 78,86.5 v1(82,86.5)
  L4 [SIG] w0.1: 113.5,83.75 116.75,83.75 v2(117.075,83.425)
  L4 [SIG] w0.15: 112.25,82.5 113.25,83.5 113.5,83.75
  L4 [SIG] w0.2: v1(82,86.5) 83,86.5 87,82.5 112.25,82.5
ADC_S\Y\N\C\: TP639.1 U201.D1 U601.16 | length 48.4
  L1 [SIG] w0.1: 116.75,79.362 116.75,80.825 117.4,81.475 U201.D1@117.4,82.45
  L1 [SIG] w0.15: 116.387,79 116.75,79.362
  L1 [SIG] w0.2: U601.16@74.4,85.175 75.325,85.175 78,82.5 v1(79,82.5) ; v1(111.225,80.5) 112.737,78.988 116.375,78.988 116.387,79
  L4 [SIG] w0.2: v1(79,82.5) 83,82.5 85,80.5 v1(111.225,80.5)
ADC_SCLK: TP637.1 U201.C3 U601.19 | length 44.5
  L1 [SIG] w0.1: v2(116.425,83.425) U201.C3@116.75,83.75
  L1 [SIG] w0.2: U601.19@74.825,86.4 77.1,86.4 78,85.5 v1(80.5,85.5)
  L4 [SIG] w0.1: 115,82 v2(116.425,83.425)
  L4 [SIG] w0.15: 113.375,82 115,82
  L4 [SIG] w0.2: v1(80.5,85.5) 83,85.5 86.5,82 113.375,82
AIN0_N: R703_8.2 R705_8.2 TP604.1 U601.30 | length 14.3
  L1 [SIG] w0.15: v2(72.386,90) 72.4,89.986 U601.30@72.4,88.825
  L6 [SIG] w0.15: TP604.1@67,93.5 67.8,94.3 70.7,94.3 72.4,92.6 72.4,90.013 v2(72.386,90)
  L6 [SIG] w0.5: R705_8.2@64,93 65.25,93 65.5,93.25 R703_8.2@65.5,94 66.229,94 66.729,93.5 TP604.1@67,93.5
AIN0_P: R702_8.2 R703_8.1 TP602.1 U601.29 | length 14.9
  L1 [SIG] w0.15: U601.29@72.8,88.825 72.8,89.986 v2(72.813,90)
  L6 [SIG] w0.15: TP602.1@67,95.5 67.8,94.7 70.866,94.7 72.8,92.766 72.8,90.013 v2(72.813,90)
  L6 [SIG] w0.5: R702_8.2@64,96 65.25,96 65.5,95.75 R703_8.1@65.5,95 66.229,95 66.729,95.5 TP602.1@67,95.5
AIN1_N: R703_7.2 R705_7.2 TP609.1 U601.31 | length 14.6
  L1 [SIG] w0.15: TP609.1@67,95.5 67.8,94.7 70.866,94.7 72,93.566 U601.31@72,88.825
  L1 [SIG] w0.5: R705_7.2@64,96 65.25,96 65.5,95.75 R703_7.2@65.5,95 66.229,95 66.729,95.5 TP609.1@67,95.5
AIN1_P: R702_7.2 R703_7.1 TP607.1 U601.32 | length 13.9
  L1 [SIG] w0.15: TP607.1@67,93.5 67.8,94.3 70.7,94.3 71.6,93.4 U601.32@71.6,88.825
  L1 [SIG] w0.5: R702_7.2@64,93 65.25,93 65.5,93.25 R703_7.1@65.5,94 66.229,94 66.729,93.5 TP607.1@67,93.5
AIN2_N: R703_6.2 R705_6.2 TP613.1 U601.2 | length 9.4
  L1 [SIG] w0.15: v2(70,87.987) 70.014,88 U601.2@71.175,88
  L6 [SIG] w0.15: TP613.1@67,88.5 67.741,89.241 68.859,89.241 69.1,89 69.1,88.509 69.609,88 69.987,88 v2(70,87.987)
  L6 [SIG] w0.5: R705_6.2@64,88 65.25,88 65.5,88.25 R703_6.2@65.5,89 66.229,89 66.729,88.5 TP613.1@67,88.5
AIN2_P: R702_6.2 R703_6.1 TP611.1 U601.1 | length 9.4
  L1 [SIG] w0.15: v2(70,88.414) 70.014,88.4 U601.1@71.175,88.4
  L6 [SIG] w0.15: TP611.1@67,90.5 67.859,89.641 69.024,89.641 69.5,89.166 69.5,88.675 69.775,88.4 69.987,88.4 v2(70,88.414)
  L6 [SIG] w0.5: R702_6.2@64,91 65.25,91 65.5,90.75 R703_6.1@65.5,90 66.229,90 66.729,90.5 TP611.1@67,90.5
AIN3_N: R703_5.2 R705_5.2 TP617.1 U601.3 | length 10
  L1 [SIG] w0.15: TP617.1@67,90.5 67.8,89.7 68.763,89.7 69.5,88.963 69.5,87.992 69.892,87.6 U601.3@71.175,87.6
  L1 [SIG] w0.5: R705_5.2@64,91 65.25,91 65.5,90.75 R703_5.2@65.5,90 66.229,90 66.729,90.5 TP617.1@67,90.5
AIN3_P: R702_5.2 R703_5.1 TP615.1 U601.4 | length 10
  L1 [SIG] w0.15: TP615.1@67,88.5 67.8,89.3 68.598,89.3 69.1,88.798 69.1,87.826 69.726,87.2 U601.4@71.175,87.2
  L1 [SIG] w0.5: R702_5.2@64,88 65.25,88 65.5,88.25 R703_5.1@65.5,89 66.229,89 66.729,88.5 TP615.1@67,88.5
AIN4_N: R703_4.2 R705_4.2 TP621.1 U601.6 | length 10.1
  L1 [SIG] w0.15: v2(70,86.386) 70.014,86.4 U601.6@71.175,86.4
  L6 [SIG] w0.15: TP621.1@67,83.5 67.8,84.3 68.763,84.3 69.5,85.037 69.5,86.125 69.775,86.4 69.987,86.4 v2(70,86.386)
  L6 [SIG] w0.5: R705_4.2@64,83 65.25,83 65.5,83.25 R703_4.2@65.5,84 66.229,84 66.729,83.5 TP621.1@67,83.5
AIN4_P: R702_4.2 R703_4.1 TP619.1 U601.5 | length 10.1
  L1 [SIG] w0.15: v2(70,86.813) 70.014,86.8 U601.5@71.175,86.8
  L6 [SIG] w0.15: TP619.1@67,85.5 67.8,84.7 68.598,84.7 69.1,85.202 69.1,86.291 69.609,86.8 69.987,86.8 v2(70,86.813)
  L6 [SIG] w0.5: R702_4.2@64,86 65.25,86 65.5,85.75 R703_4.1@65.5,85 66.229,85 66.729,85.5 TP619.1@67,85.5
AIN5_N: R703_3.2 R705_3.2 TP625.1 U601.7 | length 9.1
  L1 [SIG] w0.15: TP625.1@67,85.5 67.8,84.7 68.534,84.7 69.834,86 U601.7@71.175,86
  L1 [SIG] w0.5: R705_3.2@64,86 65.25,86 65.5,85.75 R703_3.2@65.5,85 66.229,85 66.729,85.5 TP625.1@67,85.5
AIN5_P: R702_3.2 R703_3.1 TP623.1 U601.8 | length 9.1
  L1 [SIG] w0.15: TP623.1@67,83.5 67.8,84.3 68.7,84.3 70,85.6 U601.8@71.175,85.6
  L1 [SIG] w0.5: R702_3.2@64,83 65.25,83 65.5,83.25 R703_3.1@65.5,84 66.229,84 66.729,83.5 TP623.1@67,83.5
AIN6_N: R703_2.2 R705_2.2 TP629.1 U601.10 | length 14.3
  L1 [SIG] w0.15: v2@72,84.014 U601.10@72,85.175
  L6 [SIG] w0.15: TP629.1@67,78.5 67.8,79.3 70.366,79.3 72,80.934 72,83.987 v2(72.014,84)
  L6 [SIG] w0.5: R705_2.2@64,78 65.25,78 65.5,78.25 R703_2.2@65.5,79 66.229,79 66.729,78.5 TP629.1@67,78.5
AIN6_P: R702_2.2 R703_2.1 TP627.1 U601.9 | length 13.6
  L1 [SIG] w0.15: v2@71.6,84.014 U601.9@71.6,85.175
  L6 [SIG] w0.15: TP627.1@67,80.5 67.8,79.7 70.2,79.7 71.6,81.1 71.6,83.987 v2(71.587,84)
  L6 [SIG] w0.5: R702_2.2@64,81 65.25,81 65.5,80.75 R703_2.1@65.5,80 66.229,80 66.729,80.5 TP627.1@67,80.5
AIN7_N: R703_1.2 R705_1.2 TP633.1 U601.12 | length 14.9
  L1 [SIG] w0.15: TP633.1@67,78.5 67.8,79.3 70.766,79.3 72.8,81.334 U601.12@72.8,85.175
  L1 [SIG] w0.5: R705_1.2@64,78 65.25,78 65.5,78.25 R703_1.2@65.5,79 66.229,79 66.729,78.5 TP633.1@67,78.5
AIN7_P: R702_1.2 R703_1.1 TP631.1 U601.11 | length 14.2
  L1 [SIG] w0.15: TP631.1@67,80.5 67.8,79.7 70.6,79.7 72.4,81.5 U601.11@72.4,85.175
  L1 [SIG] w0.5: R702_1.2@64,81 65.25,81 65.5,80.75 R703_1.1@65.5,80 66.229,80 66.729,80.5 TP631.1@67,80.5
ANT_IN: C914.1 L901.1 R902.1 R903.1 | length 5.6
  L1 [SIG] w0.156: L901.1@107,57 C914.1@107,56 107,55 ccw(c108,55) 108,54 R903.1@108.65,54 R902.1@110,54
AT_CTS: TP903.1 U201.J4 U901.10 | length 30.6
  L1 [SIG] w0.1: 120.65,83.1 v2(120.975,82.775)
  L1 [SIG] w0.2: U901.10@109.287,63.75 110.5,63.75 111.25,63 114.5,63 115,63.5 TP903.1@115,65.5 v1(116,66.5)
  L6 [SIG] w0.1: 120.975,81.313 v2(120.975,82.775)
  L6 [SIG] w0.15: 120.975,79.688 120.975,81.313
  L6 [SIG] w0.2: v1(116,66.5) 119.75,66.5 120.5,67.25 120.5,77.588 120.975,78.063 120.975,79.688
AT_RTS: TP904.1 U201.J2 U901.9 | length 31.3
  L1 [SIG] w0.1: v2(120.325,84.075) 120.65,84.4
  L1 [SIG] w0.2: U901.9@109.287,63.25 110,63.25 110.5,62.75 111.25,62 113.25,62 113.75,62.5 116,62.5 116.5,63 TP904.1@116.5,64 v1(116.5,67)
  L6 [SIG] w0.1: 120.325,81.312 v2(120.325,84.075)
  L6 [SIG] w0.15: 120.325,79.688 120.325,81.312
  L6 [SIG] w0.2: v1(116.5,67) 119.5,70 119.5,78.05 120.325,78.875 120.325,79.688
AT_RX: TP902.1 U201.H1 U901.12 | length 26.4
  L1 [SIG] w0.1: 118.375,78.875 118.375,80.825 118.7,81.15 119.025,81.475 119.675,81.475 120.325,82.125 120.325,83.425 120.65,83.75
  L1 [SIG] w0.15: 118.375,78.063 118.375,78.875
  L1 [SIG] w0.2: U901.12@109.287,64.75 110.25,64.75 v1(114,68.5) ; 118.375,78.063 118.75,77.687 v1(118.75,76.5)
  L6 [SIG] w0.2: v1(114,68.5) 116.5,68.5 118.75,70.75 v1(118.75,76.5)
AT_TX: TP901.1 U201.J3 U901.13 | length 24.6
  L1 [SIG] w0.1: 118.05,78.875 118.05,81.15 118.7,81.8 119.35,81.8 120,82.45
  L1 [SIG] w0.15: 118.05,78.063 118.05,78.875
  L1 [SIG] w0.2: U901.13@109.287,65.25 109.75,65.25 110.75,66.25 110.75,67.75 v1(111.5,68.5) ; v1(117.5,76.5) 117.5,77.513 118.05,78.063
  L6 [SIG] w0.2: v1(111.5,68.5) 112.5,69.5 116.5,69.5 117.5,70.5 v1(117.5,76.5)
BATT_FUSE: C1406.1 F1402.1 Q1401.3
BATT_I_SENS: C1401.1 R1401.1 TP1402.1 U1701.16 | length 8.2
  L4 [SIG] w0.2: 98.5,99.5 v1(98.5,100.5)
  L6 [SIG] w0.2: v1(98.5,100.5) 98.5,101.5 100,103 100,105.96 C1401.1@99.96,106 99.98,106.02 99.98,106.98 R1401.1@100,107
BATT_I_SENS_OUT: R1401.2 U1401.1 | length 1.9
  L6 [SIG] w0.3: U1401.1@97.15,106.95 97.175,106.975 98.975,106.975 R1401.2@99,107
BATT_IN: C1407.1 R1414.2 U1401.4 U1406.2 U1406.3 | length 1.8
  L6 [SIG] w0.3: v1@93.025,105.025 U1401.4@94.825,105.025
  other v1: 93,105
BATT_LED_A: D1402.1 R1415.2 R1416.2 | length 2.4
  L1 [SIG] w0.2: R1416.2@113.5,112 R1415.2@113.5,113 113.5,113.675 D1402.1@114,114.175
BATT_SENS: F1402.2 R1404.1 R1414.1 R1415.1 R1416.1 U1401.3 | length 18.5
  L1 [SIG] w0.2: 102,106.5 103,106.5 104.5,108 v1(105,108) ; v1(114.5,112) R1415.1@114.5,113
  L4 [SIG] w0.2: v1(105,108) 106.5,109.5 113.5,109.5 114.5,110.5 v1(114.5,112)
  L6 [SIG] w0.3: U1401.3@97.175,105.025 v1@98.975,105.025
  other v1: 99,105
BATT_V_DIV: R1404.2 R1405.1 U1404.3
BATT_V_SENS: C1403.1 R1403.1 TP1404.1 U1701.15
BATT_V_SENS_OUT: R1403.2 U1404.1 U1404.4
BOOT0: J902.6 U201.M1 U901.15 | length 78
  L1 [SIG] w0.1: U201.M1@122.6,82.45 123.25,81.8 123.9,81.8 124.55,81.15 v2(124.55,78.063)
  L1 [SIG] w0.2: U901.15@109.287,66.25 v1(110,66.25) ; v1(123,65.5) 130.5,65.5 134.5,69.5 152.5,69.5 157,65 163,65 163.525,64.475 J902.6@164.46,64.475
  L6 [SIG] w0.1: 124.55,77.25 v2(124.55,78.063)
  L6 [SIG] w0.15: 124.55,76.55 124.55,77.25
  L6 [SIG] w0.2: v1(110,66.25) 110.75,65.5 v1(123,65.5) 123.5,66 123.5,67.25 124.25,68 124.55,68.3 124.55,76.55
C\D\: J1201.9 R1207.2 TP1207.1 U201.C9 | length 53
  L1 [SIG] w0.1: U201.C9@116.75,87.65 v2(117.075,87.975)
  L1 [SIG] w0.2: v1(79,106.5) 79,107.25 79.05,107.3 J1201.9@79.05,108.75 ; v1(81.5,104) 90.5,95 v1(90.5,90)
  L4 [SIG] w0.1: 111.062,87.325 114.475,87.325 114.8,87.65 116.75,87.65 v2(117.075,87.975)
  L4 [SIG] w0.15: 109.75,87.5 110.887,87.5 111.062,87.325
  L4 [SIG] w0.2: v1(90.5,90) 91.25,89.25 93,89.25 93.25,89.5 106.5,89.5 108.5,87.5 109.75,87.5
  L6 [SIG] w0.2: v1(79,106.5) 80.5,106.5 81.5,105.5 v1(81.5,104)
C\E\: R1417.1 TP1408.1 U1406.4 U1701.5 | length 9.7
  L1 [SIG] w0.2: U1406.4@88.25,108.7 88.25,108.25 v1(89.5,107)
  L4 [SIG] w0.2: v1(89.5,107) 89.5,104.5 93,101
C\H\G\: R1424.2 TP1409.1 U1406.9 U1701.4 | length 35.8
  L1 [SIG] w0.2: U1406.9@88.25,111.3 88.25,111.75 89,112.5 v1(89.5,112.5)
  L4 [SIG] w0.2: v1(89.5,112.5) 91,112.5 93,110.5 101.5,110.5 105,107 106,107 107,108 116,108 117.5,109.5 v1(117.5,112)
CAP: C606.1 U601.24 | length 3.9
  L1 [SIG] w0.25: U601.24@74.825,88.4 74.825,90.305 74.986,90.466 v1(74.986,90.479)
  L6 [SIG] w0.25: v1(74.986,90.479) 75.479,90.479 76,91 C606.1@76,91.5
CAP_I_SENS: C1006.1 R1009.2 TP1005.1 U1702.3 | length 10.3
  L1 [SIG] w0.2: v1(94.5,100.5) 94.5,100.419 94.75,100.169 U1702.3@94.75,98.9
  L1 [SIG] w0.3: 146.25,110 151.25,110 151.54,110.29 C1006.1@151.54,111 151.52,111.02 151.52,111.98 R1009.2@151.5,112 TP1005.1@151.5,113.5
CAP_I_SENS+: R1004.2 R1005.2 U1002.3 | length 4.6
  L1 [SIG] w0.3: R1005.2@153.125,107 154.5,107 154.85,107.35 U1002.3@154.85,110.05
CAP_I_SENS-: C1004.1 R1005.1 R1006.1 U1002.4 | length 7.1
  L1 [SIG] w0.3: U1002.4@157.15,110.05 157.15,107.35 157.5,107 R1005.1@158.875,107 159,106.875 R1006.1@159,104.5
CAP_I_SENS_OUT: R1009.1 U1002.1 | length 2.4
  L1 [SIG] w0.3: R1009.1@152.5,112 152.525,111.975 154.825,111.975 U1002.1@154.85,111.95
CAP_V_DIV: R1007.2 R1008.1 U1003.3 | length 7.1
  L1 [SIG] w0.3: U1003.3@154.7,102.05 154.7,101.3 155,101 158.5,101 R1007.2@159,101.5 159.5,101.5 160,102 R1008.1@160,102.5
CAP_V_SENS: C1007.1 R1010.2 TP1006.1 U1702.4 | length 8.9
  L1 [SIG] w0.2: v1(93.5,100.5) 94.25,99.75 U1702.4@94.25,98.9
  L1 [SIG] w0.3: 146.5,101.5 TP1006.1@150.5,101.5 151.54,102.54 C1007.1@151.54,103 151.52,103.02 151.52,103.98 R1010.2@151.5,104
CAP_V_SENS_OUT: R1010.1 U1003.1 U1003.4 | length 6.2
  L1 [SIG] w0.3: R1010.1@152.5,104 152.525,103.975 154.675,103.975 U1003.1@154.7,103.95 155.55,103.95 156,103.5 156,102.5 156.45,102.05 U1003.4@157.3,102.05
CC1: J801.A5 R802.1 | length 4.3
  L1 [SIG] w0.2: J801.A5@108.25,116.245 108.25,114.25 109.5,113 R802.1@109.5,112.5
CC2: J801.B5 R801.1 | length 4.1
  L1 [SIG] w0.2: R801.1@104.5,112.5 104.5,113 105.25,113.75 J801.B5@105.25,116.245
CLK: R1204.1 TP1204.1 U201.L3 | length 60.9
  L1 [SIG] w0.1: v2(121.625,84.075) U201.L3@121.95,83.75
  L1 [SIG] w0.2: R1204.1@74.5,105.5 v1(74.5,104.5) 74.5,103 75,102.5 78,102.5 88,92.5 v1(88,87.5)
  L4 [SIG] w0.1: 112.687,85.375 114.475,85.375 115.45,84.4 121.3,84.4 v2(121.625,84.075)
  L4 [SIG] w0.15: 111.875,85.375 112.687,85.375
  L4 [SIG] w0.2: v1(88,87.5) 89.75,85.75 102.75,85.75 103.125,85.375 111.875,85.375
CMD: R1203.1 TP1203.1 U201.B8 | length 55.6
  L1 [SIG] w0.1: v2(115.775,87.325) U201.B8@116.1,87
  L1 [SIG] w0.2: v1(72.5,103.5) R1203.1@72.5,105.5 ; v1(82,102.5) 90,94.5 v1(90,89.5)
  L4 [SIG] w0.1: 111.062,87 115.45,87 v2(115.775,87.325)
  L4 [SIG] w0.15: 109.75,87 111.062,87
  L4 [SIG] w0.2: v1(90,89.5) 90.75,88.75 106,88.75 107.75,87 109.75,87
  L6 [SIG] w0.2: v1(72.5,103.5) 73.5,102.5 v1(82,102.5)
CON_CLK: J1201.5 R1204.2 | length 2.3
  L1 [SIG] w0.2: R1204.2@74.5,106.5 74.5,107.25 74.65,107.4 J1201.5@74.65,108.75
CON_CMD: J1201.3 R1203.2 | length 2.3
  L1 [SIG] w0.2: J1201.3@72.45,108.75 72.45,107.3 72.5,107.25 R1203.2@72.5,106.5
CON_D_N: J801.A7 J801.B7 U801.1 | length 6.4
  L1 [SIG] w0.135: J801.A7@106.75,116.245 106.75,117.25 107,117.5 107.5,117.5 107.75,117.25 107.75,115 107.95,114.8 U801.1@107.95,113.15
CON_D_P: J801.A6 J801.B6 U801.3 | length 5.5
  L1 [SIG] w0.135: U801.3@106.05,113.15 106.05,114.666 106.25,114.866 ; J801.B6@106.25,116.245 106.25,114.866 ; J801.A6@107.25,116.245 107.25,115 107.116,114.866 106.25,114.866
CON_DAT0: J1201.7 R1205.2 | length 2.3
  L1 [SIG] w0.2: J1201.7@76.85,108.75 76.85,107.4 77,107.25 R1205.2@77,106.5
CON_DAT1: J1201.8 R1206.2 | length 2.3
  L1 [SIG] w0.2: J1201.8@77.95,108.75 77.95,107.3 78,107.25 R1206.2@78,106.5
CON_DAT2: J1201.1 R1201.2 | length 2.4
  L1 [SIG] w0.2: J1201.1@70.25,108.75 70.25,107.5 70.5,107.25 R1201.2@70.5,106.5
CON_DAT3: J1201.2 R1202.2 | length 2.3
  L1 [SIG] w0.2: J1201.2@71.35,108.75 71.35,107.4 71.5,107.25 R1202.2@71.5,106.5
CON_VBUS: J801.A4B9 J801.A9B4 R803.1 R805.2 U801.5 U803.3 | length 24.3
  L4 [SIG] w0.3: v1(107,110.85) 107,111.5 106,112.5 106,114 107,115 107,119.5
  L6 [SIG] w0.3: R805.2@88,116.5 88,116 88.5,115.5 98.5,115.5 99,116 v1(99,117) 98.946,117 98.896,117.05 U803.3@97.15,117.05
  other v1: 106,118.5 108,118.5 106,119.5 108,119.5
DAT0: R1205.1 TP1205.1 U201.A8 | length 50.3
  L1 [SIG] w0.1: 112.687,87.325 114.475,87.325 114.8,87 U201.A8@115.45,87
  L1 [SIG] w0.15: 111.875,87.325 112.687,87.325
  L1 [SIG] w0.2: R1205.1@77,105.5 77,104.5 v1(77.5,104) 78,103.5 79,103.5 89,93.5 v1(89,88.5) ; v1(104.75,86.5) 108.775,86.5 109.6,87.325 111.875,87.325
  L4 [SIG] w0.2: v1(89,88.5) 90.25,87.25 104,87.25 v1(104.75,86.5)
DAT1: R1206.1 TP1206.1 U201.C8 | length 50.7
  L1 [SIG] w0.1: U201.C8@116.75,87 v2(117.075,86.675)
  L1 [SIG] w0.2: R1206.1@78,105.5 78,105 78.5,104.5 79,104.5 v1(79.5,104) 89.5,94 v1(89.5,89)
  L4 [SIG] w0.1: 111.7,86.5 111.875,86.675 v2(117.075,86.675)
  L4 [SIG] w0.15: 109.75,86.5 111.7,86.5
  L4 [SIG] w0.2: v1(89.5,89) 90.5,88 104.5,88 106,86.5 109.75,86.5
DAT2: R1201.1 TP1201.1 U201.A7 | length 59
  L1 [SIG] w0.1: 112.687,86.35 113.012,86.675 114.15,86.675 114.475,86.35 U201.A7@115.45,86.35
  L1 [SIG] w0.15: 110.737,86.35 112.687,86.35
  L1 [SIG] w0.2: R1201.1@70.5,105.5 v1(70.5,103.5) 70.5,102.5 71,102 77.5,102 87.5,92 v1(87.5,87) ; v1(102.5,85) 109.387,85 110.737,86.35
  L4 [SIG] w0.2: v1(87.5,87) 89.5,85 v1(102.5,85)
DAT3: R1202.1 TP1202.1 U201.B6 | length 58
  L1 [SIG] w0.1: v2(115.775,86.025) U201.B6@116.1,85.7
  L1 [SIG] w0.2: v1(71.5,104.5) R1202.1@71.5,105.5 ; v1(80,101.5) 88.5,93 v1(88.5,88)
  L4 [SIG] w0.1: 112.687,85.7 115.45,85.7 v2(115.775,86.025)
  L4 [SIG] w0.15: 112.387,86 112.687,85.7
  L4 [SIG] w0.2: v1(88.5,88) 90,86.5 103.25,86.5 103.75,86 112.387,86
  L6 [SIG] w0.2: v1(71.5,104.5) 71.5,102 72,101.5 v1(80,101.5)
DECAP_1: C1705.1 R1701.2 U1701.8
DECAP_2: C1710.1 U1702.8
EEPROM_SCL: R1102.2 TP1102.1 U201.A5 U1101.6 | length 77.2
  L1 [SIG] w0.1: v2(111.712,84.4) 112.363,85.05 U201.A5@115.45,85.05
  L1 [SIG] w0.2: TP1102.1@58.5,102.5 58.5,101.5 59,101 76.5,101 86.5,91 v1(86.5,86) ; TP1102.1@58.5,103 R1102.2@58.5,104.5 58.5,109 58.865,109.365 U1101.6@61.025,109.365
  L4 [SIG] w0.1: 111.312,84 v2(111.712,84.4)
  L4 [SIG] w0.15: 110.25,84 111.312,84
  L4 [SIG] w0.2: v1(86.5,86) 88.5,84 110.25,84
EEPROM_SDA: R1101.2 TP1101.1 U201.B5 U1101.5 | length 72.4
  L1 [SIG] w0.1: v2(111.062,84.4) 112.037,85.375 115.775,85.375 U201.B5@116.1,85.05
  L1 [SIG] w0.2: U1101.5@61.025,108.095 61,108.07 R1101.2@61,104.5 TP1101.1@61,103 61,102 61.5,101.5 77,101.5 87,91.5 v1(87,86.5)
  L4 [SIG] w0.1: 110.25,84.4 v2(111.062,84.4)
  L4 [SIG] w0.15: 109.5,84.5 109.6,84.4 110.25,84.4
  L4 [SIG] w0.2: v1(87,86.5) 89,84.5 103,84.5 103.5,85 104,85 104.5,84.5 109.5,84.5
EEPROM_W\C\: TP1103.1 U201.B4 U1101.7 | length 83.5
  L1 [SIG] w0.1: v2(112.362,84.4) 112.687,84.725 112.85,84.725 115.775,84.725 U201.B4@116.1,84.4
  L1 [SIG] w0.2: 56,102.5 56,101 56.5,100.5 76,100.5 86,90.5 v1(86,85.5) ; TP1103.1@56,103 56,106 57.5,107.5 57.5,109.5 58.635,110.635 U1101.7@61.025,110.635
  L4 [SIG] w0.1: 111.462,83.5 v2(112.362,84.4)
  L4 [SIG] w0.15: 110.25,83.5 111.462,83.5
  L4 [SIG] w0.2: v1(86,85.5) 88,83.5 110.25,83.5
EN1: R1422.2 U1406.6 | length 9.2
  L1 [SIG] w0.2: U1406.6@88.8,109.75 89.669,109.75 89.919,109.5 v1(90,109.5)
  L6 [SIG] w0.2: R1422.2@85,106 87,106 87.5,106.5 87.5,109 88,109.5 v1(90,109.5)
EN2: R1431.1 U1406.5 | length 8.4
  L1 [SIG] w0.2: U1406.5@88.8,109.25 89.25,109.25 89.5,109 v1(89.5,108.5)
  L6 [SIG] w0.2: R1431.1@85,105 88,105 88.5,105.5 88.5,107.5 v1(89.5,108.5)
ENC_1_A: R1802.1 U201.P1 | length 38.7
  L1 [SIG] w0.1: U201.P1@123.9,82.45 125.037,81.312 v2(125.037,78.063)
  L1 [SIG] w0.2: v1(128.125,77.738) 154.237,77.738 156,79.5 v1(158,79.5)
  L4 [SIG] w0.1: v2(125.037,78.063) 125.362,77.738 125.687,77.738
  L4 [SIG] w0.15: 125.687,77.738 126.5,77.738
  L4 [SIG] w0.2: 126.5,77.738 v1(128.125,77.738)
ENC_1_B: R1804.1 U201.P2 | length 39.8
  L1 [SIG] w0.1: U201.P2@123.9,83.1 124.225,82.775 124.875,82.775 125.525,82.125 v2(125.525,77.25)
  L1 [SIG] w0.2: v1(128.125,76.925) 154.925,76.925 155.5,77.5 v1(158,77.5)
  L4 [SIG] w0.1: v2(125.525,77.25) 125.85,76.925
  L4 [SIG] w0.15: 125.85,76.925 126.5,76.925
  L4 [SIG] w0.2: 126.5,76.925 v1(128.125,76.925)
ENC_1_BTN: R1812.1 U201.L2 | length 78
  L1 [SIG] w0.1: U201.L2@121.95,83.1 v2(122.275,83.425)
  L4 [SIG] w0.2: v1(67.5,71) 72,71 76,67 99,67 102,70 v1(122,70)
  L6 [SIG] w0.1: v2(122.275,83.425) 122.6,83.1 122.6,82.125
  L6 [SIG] w0.15: 122.6,81.313 122.6,82.125
  L6 [SIG] w0.2: R1812.1@62,70 64,70 65,71 v1(67.5,71) ; v1(122,70) 122.5,70.5 122.5,72.5 122,73 122,75 122.437,75.437 122.437,79.688 122.6,79.85 122.6,81.313
ENC_2_A: R1808.1 U201.R7 | length 92.3
  L1 [SIG] w0.1: U201.R7@124.55,86.35 124.875,86.025 v2(125.525,86.025)
  L4 [SIG] w0.2: v1(67.5,73) 72,73 76,69 97,69 100,72 v1(126.25,72)
  L6 [SIG] w0.1: v2(125.525,86.025) 125.525,84.563 125.687,84.4 126.337,84.4
  L6 [SIG] w0.15: 126.337,84.4 126.662,84.075 127.475,83.263 127.8,83.263 128.125,82.938
  L6 [SIG] w0.2: R1808.1@60.5,73 v1(67.5,73) ; v1(126.25,72) 127.25,71 130.25,71 131,71.75 131,78.438 128.125,81.313 128.125,82.938
ENC_2_B: R1810.1 U201.N6 | length 84.1
  L1 [SIG] w0.1: U201.N6@123.25,85.7 v2(123.575,85.375)
  L4 [SIG] w0.2: v1(67.5,72) 72,72 76,68 98,68 101,71 127,71 v1(128,72)
  L6 [SIG] w0.1: v2(123.575,85.375) 126.012,82.937 126.012,82.125
  L6 [SIG] w0.15: 126.012,79.525 126.012,82.125
  L6 [SIG] w0.2: R1810.1@64.5,72 v1(67.5,72) ; 126.012,79.525 126.663,78.875 128.125,78.875 128.937,78.063 128.937,74.937 128,74 v1(128,72)
ENC_2_BTN: R1806.1 U201.N4 | length 40.8
  L1 [SIG] w0.1: U201.N4@123.25,84.4 v2(123.575,84.075)
  L1 [SIG] w0.2: v1(128.125,76) 155,76 155.5,75.5 v1(158,75.5)
  L6 [SIG] w0.1: v2(123.575,84.075) 125.525,82.125
  L6 [SIG] w0.15: 125.525,78.063 125.525,82.125
  L6 [SIG] w0.2: 125.525,78.063 127.587,76 v1(128.125,76)
ESP_PROG_RX: J902.4 U201.L15 U901.27 | length 123
  L1 [SIG] w0.1: U201.L15@121.95,91.55 v2(121.95,92.363)
  L1 [SIG] w0.2: U901.27@104.712,65.75 104,65.75 103.75,66 103.75,69 104.25,69.5 115,69.5 117.5,67 130,67 133,70 153.5,70 157,66.5 166.5,66.5 166.761,66.239 166.761,64.714 J902.4@167,64.475
  L6 [SIG] w0.1: v2(121.95,92.363) 121.95,93.5
  L6 [SIG] w0.15: 121.95,93.5 121.95,94.313
  L6 [SIG] w0.2: 121.95,94.313 121.95,96.75 122.7,97.5 132.5,97.5 133.5,96.5 133.5,69.5 131,67 v1(129,67)
ESP_PROG_TX: J902.3 U201.M15 U901.28 | length 119.2
  L1 [SIG] w0.1: U201.M15@122.6,91.55 v2(122.925,91.875)
  L1 [SIG] w0.2: U901.28@104.712,65.25 103.75,65.25 103.25,65.75 103.25,69.5 103.75,70 115.5,70 117.5,68 128,68 v1(129,68) 131.5,70.5 154.5,70.5 157.5,67.5 166.5,67.5 166.761,67.761 166.761,69.286 J902.3@167,69.525
  L6 [SIG] w0.1: v2(122.925,91.875) 122.925,91.929 123.087,92.092 123.087,93.5
  L6 [SIG] w0.15: 123.087,93.5 123.087,94.313
  L6 [SIG] w0.2: 123.087,94.313 123.087,96.262 123.737,96.913 131.588,96.913 132.5,96 132.5,70.5 130,68 v1(129,68)
ESP_R\S\T\: J902.5 R901.2 U201.M2 U901.7 | length 82.8
  L1 [SIG] w0.1: v2(122.275,82.775) U201.M2@122.6,83.1
  L1 [SIG] w0.2: v1(107.5,62) 108,62 108.25,62.25 U901.7@108.25,62.712 ; v1(121.25,69) 128,69 130,71 155.5,71 157.5,69 163,69 163.5,69.5 164.435,69.5 J902.5@164.46,69.525
  L6 [SIG] w0.1: 121.625,82.125 v2(122.275,82.775)
  L6 [SIG] w0.15: 121.625,81.313 121.625,82.125
  L6 [SIG] w0.2: v1(107.5,62) 107,62.5 107,66.25 107.5,66.75 110.5,66.75 111.25,66 120.461,66 121.25,66.789 v1(121.25,69) 121.25,77.038 121.625,77.413 121.625,81.313
  other v1: 113,66
ESP_XTAL_N: C912.1 U901.29 Y901.1 | length 5
  L1 [SIG] w0.2: Y901.1@101.475,65.125 102.1,64.5 103.75,64.5 104,64.75 U901.29@104.712,64.75 ; Y901.1@101.475,65.175 101.508,65.208 101.508,66.467 C912.1@101.54,66.5
ESP_XTAL_P: C911.1 U901.30 Y901.3 | length 3.7
  L1 [SIG] w0.2: C911.1@102.46,62.5 102.492,62.533 Y901.3@102.492,63.792 ; Y901.3@102.525,63.825 102.558,63.792 103.543,63.792 104,64.25 U901.30@104.712,64.25
FILT_1_N: C701_1.1 D702_1.1 R704_1.2 R705_1.1 | length 4
  L1 [SIG] w0.3: R704_1.2@61.5,78 62,78.5 D702_1.1@62,79.075
  L1 [SIG] w0.5: R704_1.2@61.5,78 R705_1.1@63,78 63,78.54 63.44,78.98 63.44,78.99 63.49,79.04 C701_1.1@63.5,79.04
FILT_1_P: C701_1.2 D701_1.1 R701_1.2 R702_1.1 | length 4.3
  L1 [SIG] w0.3: D701_1.1@60.5,79.925 60.525,79.925 61.325,80.725 61.325,80.825 R701_1.2@61.5,81
  L1 [SIG] w0.5: R701_1.2@61.5,81 R702_1.1@63,81 63,80.46 63.44,80.02 63.44,80.01 63.49,79.96 C701_1.2@63.5,79.96
FILT_2_N: C701_2.1 D702_2.1 R704_2.2 R705_2.1 | length 4
  L6 [SIG] w0.3: R704_2.2@61.5,78 62,78.5 D702_2.1@62,79.075
  L6 [SIG] w0.5: R704_2.2@61.5,78 R705_2.1@63,78 63,78.54 63.44,78.98 63.44,78.99 63.49,79.04 C701_2.1@63.5,79.04